# Altium PCB EVB-2.PCBDOC (part 6 of 6)
Units mil, origin at the board's own origin, x right, y up, seen from the top; angles counter-clockwise.
Board outline 2401.57 x 1771.65 mil, 6 copper layers (Top, Mid1-H, Mid2-PWR, GND, Mid3-V, Bottom), stack 59.449 mil thick; 172 components, 166 nets, 823 pads, 550 vias.
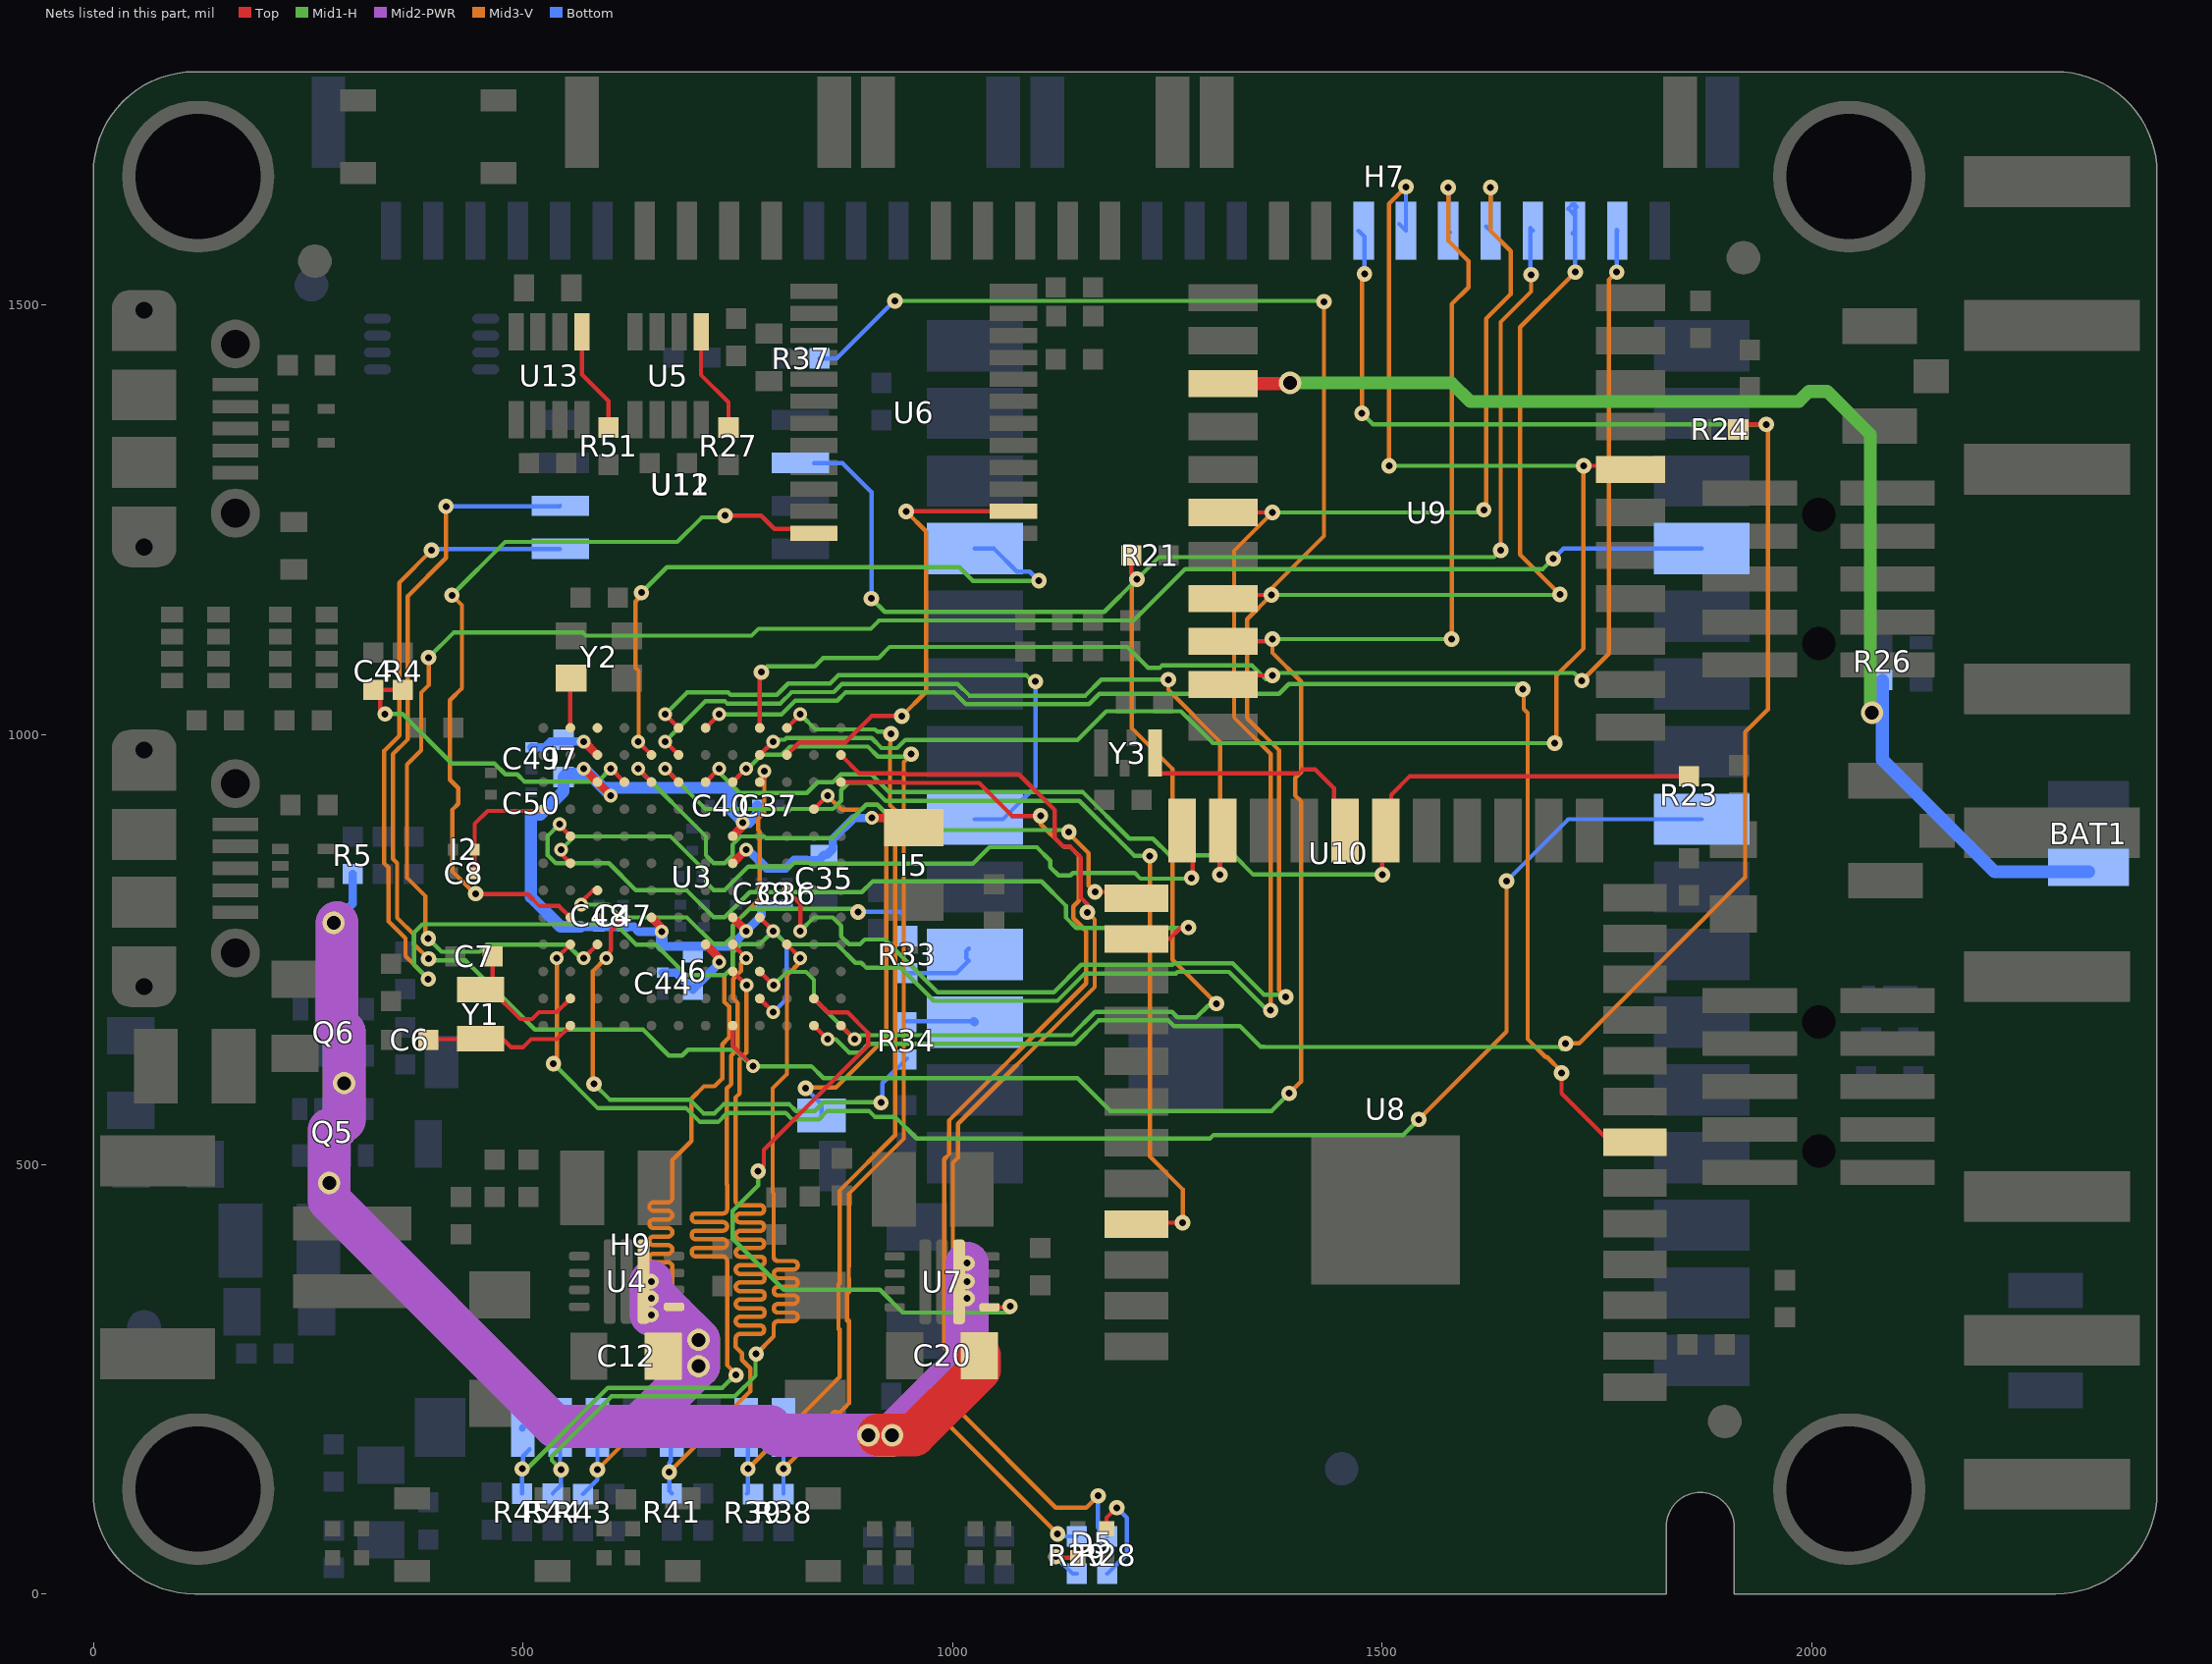
[diagram p8: the nets of this part, all layers, seen from the top]

## Via types
v1: diameter 18, hole 8, Top to Bottom, 385 vias
v2: diameter 16, hole 8, Top to Bottom, 100 vias
v3: diameter 26, hole 16, Top to Bottom, 58 vias
v4: diameter 22, hole 12, Top to Bottom, 3 vias
v5: diameter 20, hole 10, Top to Bottom, 2 vias
v6: diameter 18, hole 8.27, Top to Bottom, 2 vias

## Nets (pads, with @x,y where several pads share a name; then routed paths per layer and width w, separated by ;. In a path a pad name is that pad's centre, name@x,y a point inside that pad or via, vN(x,y) a via of type N, cw(c..) or ccw(c..) an arc to the next point about the centre after c; other vN are vias at no path point) (continued)
SD.CLK: H9.5 R41.2 U3.K8 | length 1190
  Top w5: U3.K8@744.09,724.41 v2(760.05,708.45)
  Mid3-V w5: v1(670.28,141.73) 764.53,235.99 764.53,262.74 754.86,272.4 754.86,280.23 747.59,287.5 747.59,292.5 747.59,297.5 cw(c752.59,297.5) 752.59,302.5 775.74,302.5 ccw(c775.74,307.5) 780.74,307.5 ccw(c775.74,307.5) 775.74,312.5 752.59,312.5 cw(c752.59,317.5) 747.59,317.5 cw(c752.59,317.5) 752.59,322.5 776.37,322.5 ccw(c776.37,327.5) 781.37,327.5 ccw(c776.37,327.5) 776.37,332.5 752.59,332.5 cw(c752.59,337.5) 747.59,337.5 cw(c752.59,337.5) 752.59,342.5 776.37,342.5 ccw(c776.37,347.5) 781.37,347.5 ccw(c776.37,347.5) 776.37,352.5 752.59,352.5 cw(c752.59,357.5) 747.59,357.5 cw(c752.59,357.5) 752.59,362.5 776.37,362.5 ccw(c776.37,367.5) 781.37,367.5 ccw(c776.37,367.5) 776.37,372.5 752.59,372.5 cw(c752.59,377.5) 747.59,377.5 cw(c752.59,377.5) 752.59,382.5 776.37,382.5 ccw(c776.37,387.5) 781.37,387.5 ccw(c776.37,387.5) 776.37,392.5 752.59,392.5 cw(c752.59,397.5) 747.59,397.5 cw(c752.59,397.5) 752.59,402.5 775.74,402.5 ccw(c775.74,407.5) 780.74,407.5 ccw(c775.74,407.5) 775.74,412.5 752.59,412.5 cw(c752.59,417.5) 747.59,417.5 cw(c752.59,417.5) 752.59,422.5 775.74,422.5 ccw(c775.74,427.5) 780.74,427.5 ccw(c775.74,427.5) 775.74,432.5 752.59,432.5 cw(c752.59,437.5) 747.59,437.5 cw(c752.59,437.5) 752.59,442.5 775.74,442.5 ccw(c775.74,447.5) 780.74,447.5 ccw(c775.74,447.5) 775.74,452.5 752.59,452.5 cw(c752.59,457.5) 747.59,457.5 747.59,476 747.59,536.16 747.28,536.47 747.28,577.74 752.21,582.68 752.21,622.41 759.91,630.1 759.91,708.31 v2(760.05,708.45)
  Bottom w5: R41.2@673.23,117.13 670.28,120.08 v1(670.28,141.73) 670.28,152.56 672.24,154.53 672.24,170.49 681.1,179.34 H9.5@681.1,193.9
SD.CMD: H9.3 R43.2 U3.C9 | length 1186.2
  Top w5: U3.C9@775.59,944.88 781.83,951.13 780.89,952.07 v2(780.89,957.67)
  Mid3-V w5: v1(586.61,144.69) 673.84,231.92 673.84,380.91 ccw(c668.84,380.91) 668.84,385.91 652.16,385.91 cw(c652.16,390.91) 647.16,390.91 cw(c652.16,390.91) 652.16,395.91 668.84,395.91 ccw(c668.84,400.91) 673.84,400.91 ccw(c668.84,400.91) 668.84,405.91 652.16,405.91 cw(c652.16,410.91) 647.16,410.91 cw(c652.16,410.91) 652.16,415.91 668.84,415.91 ccw(c668.84,420.91) 673.84,420.91 ccw(c668.84,420.91) 668.84,425.91 652.16,425.91 cw(c652.16,430.91) 647.16,430.91 cw(c652.16,430.91) 652.16,435.91 668.84,435.91 ccw(c668.84,440.91) 673.84,440.91 ccw(c668.84,440.91) 668.84,445.91 652.16,445.91 cw(c652.16,450.91) 647.16,450.91 cw(c652.16,450.91) 652.16,455.91 668.84,455.91 ccw(c668.84,460.91) 673.84,460.91 673.84,504.84 696.1,527.09 696.1,576.29 710.61,590.8 722.95,590.8 732.03,599.88 732.03,639.78 739.91,647.66 739.91,683.58 734.55,688.94 734.55,719.94 743.85,729.23 743.85,777.58 775.34,809.07 775.34,887.15 773.56,888.93 773.56,901.78 780.89,909.11 v2(780.89,957.67)
  Bottom w5: R43.2@569.88,116.14 586.61,132.87 v1(586.61,144.69) H9.3@586.61,193.9
SD.D0: H9.7 R39.2 U3.A10 | length 1183.7
  Top w5: U3.A10@807.09,1007.87 v2(822.83,1023.62)
  Mid1-H w5: v2(822.83,1023.62) 840.28,1006.18 909.76,1006.18 912.46,1003.47 925.66,1003.47 v1(928.15,1000.98)
  Mid3-V w5: v1(761.81,145.67) 798.23,182.09 ccw(c794.69,185.62) 798.23,189.16 cw(c801.76,192.69) 798.23,196.23 cw(c801.76,192.69) 805.3,196.23 808.83,192.7 815.75,185.78 ccw(c819.29,189.31) 822.82,185.78 ccw(c819.29,189.31) 822.82,192.85 818.9,196.77 cw(c821.89,199.77) 818.9,202.76 868.43,252.29 868.43,308.14 867.2,308.14 867.2,361.14 868.43,361.14 868.43,469.11 933.21,533.89 933.21,912.02 927.17,918.06 927.17,978.52 927.17,978.74 v1(928.15,1000.98)
  Bottom w5: R39.2@760.83,116.65 761.81,117.63 v1(761.81,145.67) 761.81,191.93 H9.7@760.83,192.91
  Bottom w8: H9.7@759.84,193.9 H9.7@760.83,192.91
SD.D1: H9.8 R38.2 U3.C8 | length 1212
  Top w5: U3.C8@744.09,944.88 v2(759.84,960.63)
  Mid1-H w5: v2(759.84,960.63) 761.93,960.63 777.93,976.63 801.18,976.63 810.73,986.18 901.47,986.18 913.17,974.48 948.89,974.48 v1(951.82,977.41)
  Mid3-V w5: v1(803.15,145.67) 857.28,199.8 860.82,203.34 860.57,203.58 cw(c864.11,207.12) 860.57,210.65 cw(c864.11,207.12) 867.65,210.65 867.89,210.41 874.51,217.03 879.25,221.77 879.25,318.14 877.2,318.14 877.2,351.14 879.25,351.14 879.25,367.1 879.16,367.18 879.16,380.85 879.25,380.93 879.25,465.79 943.21,529.75 943.21,967.98 951.82,976.59 v1(951.82,977.41)
  Bottom w5: R38.2@803.15,116.65 v1(803.15,145.67) H9.8@803.15,193.9
SD.D2: H9.1 R45.2 U3.J8 | length 1091.2
  Top w5: U3.J8@744.09,755.91 v2(759.84,740.16)
  Mid1-H w5: v1(499.02,145.67) 504.68,145.67 599.02,240 732.12,240 v1@748.03,255.9
  Mid3-V w5: v1@748.03,255.9 737.59,266.34 737.59,387.8 ccw(c732.59,387.8) 732.59,392.8 701.4,392.8 cw(c701.4,397.8) 696.4,397.8 cw(c701.4,397.8) 701.4,402.8 732.59,402.8 ccw(c732.59,407.8) 737.59,407.8 ccw(c732.59,407.8) 732.59,412.8 701.4,412.8 cw(c701.4,417.8) 696.4,417.8 cw(c701.4,417.8) 701.4,422.8 732.59,422.8 ccw(c732.59,427.8) 737.59,427.8 ccw(c732.59,427.8) 732.59,432.8 701.4,432.8 cw(c701.4,437.8) 696.4,437.8 cw(c701.4,437.8) 701.4,442.8 732.59,442.8 ccw(c732.59,447.8) 737.59,447.8 737.59,452.8 737.59,476.03 737.28,476.34 737.28,588.34 742.21,593.28 742.21,626.55 749.91,634.24 749.91,687.73 744.55,693.08 744.55,715.8 753.85,725.09 753.85,734.16 v2(759.84,740.16)
  Bottom w5: R45.2@499.02,116.65 v1(499.02,145.67) ; v1@500,151.58 500,160.43 H9.1@507.87,168.31
  Bottom w8: H9.1@499.02,192.91 H9.1@500,193.9
  other v1: 748.03,254.72
SD.D3: H9.2 R44.2 U3.J10 | length 1097.9
  Top w5: U3.J10@807.09,755.91 v2(822.83,740.16)
  Mid1-H w5: v1(544.29,144.69) 533.46,155.51 533.46,160.31 603.16,230 746.64,230 770.59,253.95 770.59,278.47 v1(771.36,279.24)
  Mid3-V w5: v1(771.36,279.24) 791.79,299.66 791.79,302.5 791.79,307.5 791.79,312.5 cw(c796.79,312.5) 796.79,317.5 814.84,317.5 ccw(c814.84,322.5) 819.84,322.5 ccw(c814.84,322.5) 814.84,327.5 796.79,327.5 cw(c796.79,332.5) 791.79,332.5 cw(c796.79,332.5) 796.79,337.5 814.84,337.5 ccw(c814.84,342.5) 819.84,342.5 ccw(c814.84,342.5) 814.84,347.5 796.79,347.5 cw(c796.79,352.5) 791.79,352.5 cw(c796.79,352.5) 796.79,357.5 814.84,357.5 ccw(c814.84,362.5) 819.84,362.5 ccw(c814.84,362.5) 814.84,367.5 796.79,367.5 cw(c796.79,372.5) 791.79,372.5 cw(c796.79,372.5) 796.79,377.5 814.84,377.5 ccw(c814.84,382.5) 819.84,382.5 ccw(c814.84,382.5) 814.84,387.5 796.79,387.5 cw(c796.79,392.5) 791.79,392.5 791.79,405.51 791.79,466.54 790.63,467.7 790.63,588.51 807.12,605 807.12,652.3 ; 807.13,652.31 807.13,719.88 822.83,735.59 v2(822.83,740.16)
  Bottom w5: R44.2@534.74,117.13 544.29,126.68 v1(544.29,144.69) ; v1@543.31,144.69 H9.2@543.31,193.9
SD.DETECT: H9.S1 U3.D11 | length 522.6
  Top w5: U3.D11@838.58,913.39 v2(854.33,929.13)
  Mid3-V w5: v1(828.78,588.61) 829.53,589.36 864.17,589.36 923.04,648.23 923.04,908.04 912.47,918.61 899.63,918.61 893.72,912.69 870.77,912.69 v2(854.33,929.13)
  Bottom w5: v1(828.78,588.61) 828.78,588.54 847.44,569.88 H9.S1@847.44,557.09
SHDN1: R27.1 U5.5 | length 124.7
  Top w5: U5.5@707.22,1468.97 707.22,1418.76 739.17,1386.81 R27.1@739.17,1357.49
SHDN2: R51.1 U13.5 | length 124.3
  Top w5: U13.5@568.68,1468.97 568.68,1419.18 599.55,1388.31 R51.1@599.55,1357.49
SP330-DUPLEX: U3.B10 U6.14 | length 537.1
  Top w5: U3.B10@807.09,976.38 821.85,991.14 875.27,991.14 905.83,1021.7 v1(940.99,1021.7) ; v1(945.87,1259.84) 946.07,1260.05 U6.14@1070.87,1260.05
  Mid3-V w5: v1(940.99,1021.7) 969.05,1049.76 969.05,1236.66 v1(945.87,1259.84)
SP330-SLEW: U3.H2 U6.12 | length 970.6
  Top w5: v1@440.26,814.64 505.25,814.64 519.26,800.62 541.9,800.62 U3.H2@555.12,787.4 ; v1(735.27,1254.98) 777.2,1254.98 792.7,1239.49 833.55,1239.49 U6.12@838.58,1234.46
  Mid1-H w5: v1(417.32,1162.4) 479.33,1224.41 679.58,1224.41 708.2,1253.03 733.32,1253.03 v1(735.27,1254.98)
  Mid3-V w5: v1(417.32,1162.4) 429.03,1150.69 429.03,1054.03 415.12,1040.12 415.12,947.52 424.61,938.03 424.61,919.51 418.07,912.96 418.07,840.85 440.94,817.98 443.96,814.96 v1(444.88,814.96)
uINS-Ser0.RxD: H7.8 U3.B9 U9.18 | length 2004.1
  Top w5: U3.B9@775.59,976.38 v2(791.34,992.13) ; v1(1734.25,1312.99) 1789.61,1312.99 U9.18@1793.94,1308.66
  Mid1-H w5: v2@792.41,996.18 794.36,994.23 804.64,994.23 806.59,996.18 905.62,996.18 917.31,984.48 935.56,984.48 944.98,993.91 1145.4,993.91 1178.86,1027.38 1265.75,1027.38 1302.97,990.16 1695.67,990.16 1698.23,992.72 1700.8,995.29 v1@1706.4,995.28 ; v1(1507.87,1312.99) v1(1734.25,1312.99) ; v1@1698.82,992.13 v1(1700.79,990.16)
  Mid3-V w5: v2(791.34,992.13) v2@794.05,994.84 ; v1(1507.87,1312.99) 1507.87,1617.93 v1(1527.56,1637.61) ; v1(1700.79,990.16) 1702.76,992.13 1702.76,1068.9 1734.25,1100.39 v1(1734.25,1312.99)
  Bottom w5: H7.8@1519.68,1594.49 H7.8@1527.56,1586.61 v1(1527.56,1637.61)
uINS-Ser0.TxD: H7.7 R24.2 U3.M11 | length 2472.9
  Top w5: U3.M11@838.58,661.42 v2(854.33,645.67) ; R24.2@1914.37,1355.31 1920.28,1361.23 v1(1946.85,1361.23)
  Mid1-H w5: v2(854.33,645.67) 863.91,645.67 879.41,630.17 892.25,630.17 902.35,640.27 1142.7,640.27 1169.92,667.49 1251.07,667.49 1257.57,660.99 1334.2,660.99 1358.47,636.73 1362.46,636.73 1362.61,636.58 1706.67,636.58 v1@1709.15,634.09 ; v1@1472.44,1377.95 v1(1476.38,1374.02) 1489.17,1361.23 v1(1946.85,1361.23)
  Mid3-V w5: v1(1476.38,1374.02) 1476.38,1533.46 v1(1479.33,1536.42) ; v1(1713.48,640.64) 1728.93,640.64 1922.24,833.95 1922.24,1002.95 1948.82,1029.53 v1@1948.82,1361.23
  Bottom w5: H7.7@1472.44,1586.61 1479.33,1579.72 v1(1479.33,1536.42)
uINS-Ser1.CS: H7.12 R37.2 U3.G10 U9.8 | length 3125.7
  Top w5: U3.G10@807.09,818.9 822.83,803.15 v2(822.83,771.65) ; U9.8@1309.68,1158.66 1309.88,1158.46 1314.07,1162.65 v1(1371.06,1162.65)
  Mid1-H w5: v2(822.83,771.65) 838.58,787.4 860.5,787.4 870.33,777.58 870.33,765.23 879.41,756.15 892.25,756.15 897.71,761.62 921.2,761.62 982.53,700.29 1117.86,700.29 1149.72,732.14 1255.72,732.14 1257.57,733.99 1325.86,733.99 1362.36,697.49 v1@1387.8,697.49 ; v1(932.82,1504.92) 1431.1,1504.92 v1(1432.09,1503.94) ; v1(1371.06,1162.65) 1705.96,1162.65 v1(1706.69,1163.39)
  Mid3-V w5: v1(1387.8,694.88) 1380.08,702.6 1380.08,981.69 1342.82,1018.95 1342.82,1134.4 v1(1371.06,1162.65) 1371.06,1170.28 1432.09,1231.3 v1(1432.09,1503.94) ; v1(1706.69,1163.39) 1660.43,1209.65 1660.43,1474.33 v1(1724.56,1538.46)
  Bottom w5: R37.2@845,1437.99 865.16,1437.99 932.09,1504.92 v1(932.82,1504.92) ; H7.12@1721.46,1583.66 H7.12@1724.41,1586.61 1724.41,1604.33 1716.53,1612.21 1722.59,1618.27 1726.37,1614.49 1724.56,1612.68 v1(1724.56,1538.46)
uINS-Ser1.RxD/MOSI: H7.10 U3.H9 U3.L9 U9.6 U11.5 U12.5 | length 3409.4
  Top w5: U3.L9@775.59,692.91 v2(791.33,677.16) ; U3.H9@775.59,787.4 v2(791.34,771.65) ; U9.6@1309.68,1258.66 v1(1372.22,1258.66)
  Mid1-H w5: v1(389.85,715.59) 373.28,732.15 373.28,769.67 382.95,779.33 608.1,779.33 631.78,755.66 654.58,755.66 690.08,720.15 734.77,720.15 743.85,729.23 743.85,746.08 753.92,756.15 775.84,756.15 v2(791.34,771.65) 807.09,755.91 865.51,755.91 886.76,734.66 893.66,734.66 899.71,728.62 940.05,728.62 978.38,690.29 1122.01,690.29 1153.86,722.14 1259.87,722.14 1261.72,723.99 1321.71,723.99 1366.57,679.13 v1(1370.08,679.13) ; v1(1372.22,1258.66) 1614.96,1258.66 v1(1618.11,1261.81)
  Mid3-V w5: v1(389.85,715.59) 389.85,716.04 363.28,742.61 363.28,763.1 343.6,782.79 343.6,845.3 338.58,850.32 338.58,981.4 356.07,998.89 356.07,1062.28 ; v1(393.7,1214.57) 356.03,1176.9 356.03,1062.32 ; v1(1370.08,679.13) 1370.08,977.55 1327.67,1019.96 1327.67,1214.11 v1(1372.22,1258.66) ; v1(1618.11,1261.81) 1621.06,1264.78 1621.06,1484.25 1649.61,1512.8 1649.61,1562.99 1625.99,1586.61 v1(1625.99,1636.81) ; 356.03,1062.32 356.07,1062.28
  Bottom w5: v1(393.7,1214.57) 395.47,1216.34 U11.5@543.31,1216.34 ; v2(791.33,677.16) 807.05,692.88 807.05,755.94 v2(791.34,771.65) ; H7.10@1621.06,1591.54 H7.10@1625.98,1586.61 v1(1625.99,1636.81)
uINS-Ser1.SCLK: H7.9 U3.M8 U9.9 U11.6 U12.6 | length 3271.7
  Top w5: U3.M8@744.09,661.42 744.09,637.79 v2(767.71,614.17) ; U9.9@1309.68,1108.66 1369.6,1108.66 v1(1372.22,1111.27)
  Mid1-H w5: v1(390.02,739.21) 391.77,737.46 433.13,737.46 513.82,656.78 639.81,656.78 669.91,626.68 685.11,626.68 691.97,633.54 746.53,633.54 765.9,614.17 v2(767.71,614.17) 835.62,614.17 849.63,600.17 1145.43,600.17 1183.37,562.22 1371.28,562.22 v1(1391.73,582.68) ; v1(1372.22,1111.27) v1(1580.79,1111.27)
  Mid3-V w5: v1(390.02,739.21) v1(390.02,739.21) 373.28,756 373.28,767.25 353.6,786.93 353.6,850.63 348.58,855.64 348.58,977.26 366.07,994.74 366.07,1066.42 366.03,1066.46 366.03,1161.31 410.43,1205.71 v1(410.43,1265.75) ; v1(1372.22,1111.27) 1372.22,1095.3 1405.51,1062.01 1405.51,956.41 1398.85,949.75 1398.85,929.19 1405.51,922.53 1405.51,596.46 v1(1391.73,582.68) ; v1(1576.77,1636.81) 1576.77,1574.8 1600.39,1551.18 1600.39,1520.67 1580.79,1501.06 v1(1580.79,1111.27)
  Bottom w5: v1@411.02,1266.34 v1(410.43,1265.75) 542.72,1265.75 U11.6@543.31,1266.34 ; v1(1576.77,1636.81) H7.9@1576.77,1586.61 H7.9@1578.74,1584.65
uINS-Ser1.TxD/MISO: H7.11 R21.2 U3.K9 U3.M12 U11.2 U12.2 | length 2566.2
  Top w5: U3.K9@775.59,724.41 v2(791.55,708.45) ; U3.M12@870.08,661.42 v2(885.83,645.67) ; R21.2@1208.03,1208.66 1208.03,1187.64 v1(1214.57,1181.1)
  Mid1-H w5: v2(791.55,708.45) 807.05,723.95 829.46,723.95 838.54,714.87 838.54,692.92 851.34,680.12 ; 851.38,680.12 v2(885.83,645.67) 888.8,645.67 893.42,650.29 1138.57,650.29 1165.78,677.49 1255.22,677.49 1261.72,670.99 1283.67,670.99 1297.64,684.96 1307.08,684.96 v1(1307.08,687.01) ; v1@905.56,1158.52 v1(905.56,1158.46) 921.07,1142.95 1176.41,1142.95 v1(1214.57,1181.1) 1240.16,1206.69 1629.92,1206.69 v1(1637.8,1214.57)
  Mid3-V w5: v1@1211.54,1178.07 1208.66,1175.2 1208.66,1007.43 1256.07,960.02 1256.07,738.02 v1(1307.08,687.01) ; v1(1637.8,1214.57) 1637.8,1480.31 1673.23,1515.75 v1(1673.23,1535.43)
  Bottom w5: U12.2@838.58,1316.14 871.84,1316.14 905.56,1282.43 v1@905.56,1158.52 ; v1@1672.24,1535.43 1672.24,1589.57 H7.11@1675.2,1586.61
uINS-SPI-EN: H7.13 U3.A9 U9.10 | length 1675.8
  Top w5: U3.A9@775.59,1007.87 775.59,1070.87 v1(777.55,1072.83) ; U9.10@1309.68,1058.66 1320.02,1069 v1(1372.27,1069)
  Mid1-H w5: v1(777.55,1072.83) 784.32,1079.6 839.62,1079.6 849.14,1089.12 913.65,1089.12 926.7,1102.17 1203.35,1102.17 1227.48,1078.04 1241.15,1078.04 1243.63,1080.53 1348.6,1080.53 1364.17,1064.96 1371.13,1071.92 1723.35,1071.92 v1(1732.28,1062.99)
  Mid3-V w5: v1(1732.28,1062.99) 1763.78,1094.49 1763.78,1529.45 v1(1772.79,1538.46)
  Bottom w5: 1364.17,1064.96 1368.21,1069 v1(1372.27,1069) ; v1(1772.79,1538.46) 1772.79,1587.44 H7.13@1773.62,1586.61
VBAT: BAT1.+ R26.1 U9.3 | length 1504.1
  Top w15: U9.3@1309.68,1408.66 1391.93,1408.66 v3(1392.72,1409.45)
  Mid1-H w15: v3(1392.72,1409.45) 1580.71,1409.45 1602.21,1387.95 1985,1387.95 1996.51,1399.45 2017.87,1399.45 2068.15,1349.17 2068.15,1027.32 v3(2069.88,1025.59)
  Bottom w15: R26.1@2082.05,1063.48 2082.05,971.1 2212.83,840.31 BAT1.+@2322.06,840.31
VBG: C4.1 R4.1 U3.C4 | length 381.2
  Top w5: v1(339.57,1024.1) 333.66,1030.01 333.66,1052.09 360.16,1052.09 R4.1@360.24,1052.17 ; v2(602.36,960.63) U3.C4@618.11,944.88
  Mid1-H w5: v1(339.57,1024.1) 359.75,1024.1 417.32,966.54 466.82,966.54 479.57,953.78 493.33,953.78 501.98,945.13 586.86,945.13 v2(602.36,960.63)
VDDOUT: C36.1 C37.1 C38.1 C40.1 C47.1 C48.1 C50.1 I6.2 I7.2 U3.C3 U3.E8 U3.H5 U3.H8 | length 919.5
  Top w10: v2(570.87,960.63) U3.C3@586.61,944.88 v2(602.36,929.13) ; U3.H5@649.36,787.65 v2@663.88,773.13 ; U3.H8@744.09,787.4 v2(759.84,771.65) ; U3.E8@744.09,881.89 v2@757.87,895.67
  Bottom w10: 566.93,776.57 C48.1@588.58,776.57 C47.1@616.14,776.57 628.94,776.57 634.8,770.71 v2(661.45,770.71) ; 661.43,753.65 741.84,753.65 v2(759.84,771.65) 777.56,789.37 C38.1@777.56,802.16 C36.1@807.09,802.16
  Bottom w12: C40.1@743.11,916.42 743.11,910.43 v2(755.9,897.64) 762.79,897.64 772.63,907.48 C37.1@772.63,917.32 ; C40.1@743.11,917.32 743.11,932.08
  Bottom w14: 566.93,776.57 543.71,776.57 509.19,811.09 509.19,906.83 520.01,906.83 547.25,934.06 I7.2@547.25,950.79 551.18,954.72 v2@570.87,954.72 ; v2(570.87,960.63) 593.31,938.19 ; v2(602.36,929.13) 593.31,938.19 ; 661.43,753.65 v2@661.43,770.69 ; 743.11,932.08 737,938.19 593.31,938.19
VDDPLL: C44.1 I6.1 U3.J7 | length 110.5
  Top w10: U3.J7@712.6,755.91 v2@728.35,740.16
  Bottom w10: C44.1@662.64,723.17 678.09,723.17 I6.1@697.84,703.42 727.2,732.78 727.2,734.51 v2(728.35,735.65)
VDDPLLUSB: C35.1 I5.1 U3.F8 | length 262.7
  Top w10: U3.F8@744.09,850.39 v2(759.84,866.14) ; v2(906.05,903.11) 943.35,903.11 I5.1@954.72,891.73
  Bottom w10: v2(759.84,866.14) 761.94,866.14 783.88,844.2 805.46,844.2 815.38,854.13 830.29,854.13 830.88,853.53 843.69,853.53 C35.1@850.39,860.24 853.86,860.24 860.67,867.05 860.67,878.73 885.05,903.11 v2(906.05,903.11)
VDDUTMIC: C49.1 I7.1 U3.B3 | length 86.1
  Top w10: v2(570.87,992.13) U3.B3@586.61,976.38
  Bottom w10: C49.1@509.84,985.24 525.6,985.24 532.48,992.13 v2(570.87,992.13)
VIN: C12.1 C20.1 Q5.S2 Q6.S2 R5.2 U4.1 U4.8 U7.1 | length 1976.3
  Top w50: v3@913.89,185.04 955.33,185.04 1031.12,260.83 C20.1@1031.12,277.33
  Mid2-PWR w8: v3@270.67,790.02 v3(279.69,781)
  Mid2-PWR w50: 274.57,540.34 v3(274.57,478.31) 274.57,458.07 537.64,195 ; 283.46,543.27 291.75,551.56 v3(291.75,594.49) 291.75,654 283.63,662.13 v3@283.63,781 ; 541.57,195 634.34,195 ; v1(649.23,363.68) v1(649.23,344) ; v1(1016.74,385) v1(1016.74,363.68) v1(1016.74,344) 1016.74,271.81 v3(929.63,184.71) v3(902.07,184.71) 797.69,184.71 787.4,195 634.34,195 ; 634.34,195 v3(704.34,265) v3(704.34,295.77) 675.31,324.8 ; v1(649.23,344) 656.12,344 675.31,324.8 ; v1(649.23,344) v1(649.23,324.8) 675.31,324.8
  Bottom w10: v3(279.69,781) 301.99,803.29 R5.2@301.99,837.93
  Bottom w18: v3@279.69,780 279.69,740.82 292.32,728.19 Q6.S2@292.32,680.55 ; Q5.S2@291.34,564.41 291.34,594.07 v3(291.75,594.49)
VREFP: C8.1 I2.1 U3.D1 | length 144.6
  Top w5: C8.1@443.9,838.58 I2.1@443.9,866.27 443.9,896.37 458.95,911.42 521.65,911.42 U3.D1@523.62,913.39
W_RTC: U8.20 Y3.3 | length 290.6
  Top w5: Y3.3@1234.25,954.88 1402.48,954.88 1407.02,959.41 1422.19,959.41 1443.9,937.7 1443.9,917.32 1456.54,904.69 U8.20@1456.54,888.35 ; Y3.3@1235.69,963.13 Y3.3@1235.69,978.63
WiFi-EN: R23.2 U3.C7 U8.19 | length 1324.1
  Top w5: U3.C7@712.6,944.88 v2(728.35,960.63) ; v1(1500,837.16) U8.19@1500,892.28 ; U8.19@1503.94,888.35 U8.19@1500,892.28 ; R23.2@1857.05,951.77 1532.19,951.77 1510.35,929.93 1510.35,902.63 U8.19@1500,892.28
  Mid1-H w5: v2(728.35,960.63) 728.35,956.06 752.24,932.17 830.44,932.17 842.9,944.63 860.75,944.63 870.05,953.94 905.43,953.94 926.23,933.14 1151.58,933.14 1205.58,879.14 1233.12,879.14 1252.45,859.81 1327.2,859.81 1349.85,837.16 v1(1500,837.16)
WiFi-IRQN: U3.C6 U8.33 | length 1161.6
  Top w5: v2(665.35,960.63) U3.C6@681.1,944.88 ; U8.33@1213.94,430.37 1212.22,432.09 v1(1267.72,432.09)
  Mid1-H w5: v2(665.35,960.63) 712.35,913.63 860.75,913.63 870.33,923.21 870.33,935.53 878.74,943.94 901.29,943.94 922.09,923.14 1147.44,923.14 1211.5,859.07 v1(1229.57,859.07)
  Mid3-V w5: v1(1229.57,859.07) 1229.57,509.1 1267.72,470.95 v1(1267.72,432.09)
WiFi-RST: U3.A7 U8.7 | length 1591
  Top w5: U3.A7@712.6,1007.87 v2(728.35,1023.62) ; v1(1708.66,606.3) 1708.66,582.68 1765.53,525.81 U8.7@1793.94,525.81
  Mid1-H w5: v2(728.35,1023.62) 800.91,1023.62 816.89,1039.6 865.74,1039.6 875.26,1049.12 1001.9,1049.12 1015.51,1035.51 1158.71,1035.51 1170.73,1047.53 1379.84,1047.53 1391.37,1059.06 1657.47,1059.06 v1(1663.38,1053.15)
  Mid3-V w5: v1@1663.38,1046.93 v1(1663.38,1053.15) 1664.6,1051.92 1664.6,1029.97 1669.29,1025.28 1669.29,645.66 1690.19,624.77 1691.87,624.77 1708.66,607.99 v1(1708.66,606.3)
WiFi-SPI.CS: U3.C5 U8.25 | length 753.6
  Top w5: v2(633.86,960.63) U3.C5@649.61,944.88 ; v1(1165.78,817.06) 1192.15,817.06 U8.25@1201.19,808.02
  Mid1-H w5: v2(633.86,960.63) 712.85,881.64 712.85,859.72 721.93,850.64 734.77,850.64 743.85,859.72 743.85,872.07 753.42,881.64 780.85,881.64 782.64,879.85 860.31,879.85 899.06,918.61 912.47,918.61 942.07,889.01 1133.03,889.01 v1(1135.33,886.71)
  Mid3-V w5: v1(1135.33,886.71) 1135.33,885.07 1158.42,861.98 1158.42,824.41 v1(1165.78,817.06)
WiFi-SPI.MISO: U3.F2 U8.24 | length 900.4
  Top w5: v2@539.37,866.14 U3.F2@555.12,850.39 ; U8.24@1266.93,888.35 1279.53,875.75 1279.53,834.65 v1(1278.19,833.31)
  Mid1-H w5: v2(544.32,866.18) 559.78,881.64 671.77,881.64 712.85,840.57 712.85,828.23 721.93,819.15 734.77,819.15 762.32,846.7 811.49,846.7 815.82,851.03 833.41,851.03 834.62,849.81 1023.65,849.81 1042.84,869.01 1098.07,869.01 1113.79,853.29 1113.79,845.79 1123.46,836.13 1137.12,836.13 1140.07,839.07 1212.09,839.07 1218.59,832.57 1277.45,832.57 v1(1278.19,833.31)
WiFi-SPI.MOSI: U3.E2 U8.26 | length 954
  Top w5: v2@539.37,897.64 U3.E2@555.12,881.89 ; U8.26@1213.94,762.18 1252.33,762.18 1265.75,775.59 v1(1274.47,775.59)
  Mid1-H w5: v2(542.6,896.11) 528.82,882.33 528.82,859.76 538.19,850.39 600.12,850.39 631.62,818.9 690.68,818.9 721.93,787.65 734.77,787.65 763.93,816.81 894.41,816.81 907.09,829.49 1103.34,829.49 1131.76,801.08 1131.76,787.4 1144.02,775.14 1274.03,775.14 v1(1274.47,775.59)
WiFi-SPI.SCLK: U3.B6 U8.23 | length 962.3
  Top w5: v2(665.35,992.13) U3.B6@681.1,976.38 ; v1(1311.19,837.16) 1311.19,869.12 1303.14,877.16 U8.23@1314.33,888.35
  Mid1-H w5: v2(665.35,992.13) 712.35,1039.12 734.77,1039.12 737.56,1036.33 799.48,1036.33 812.75,1049.6 861.6,1049.6 871.12,1059.12 1006.04,1059.12 1019.65,1045.51 1154.57,1045.51 1173.09,1064.03 v1(1251.05,1064.03)
  Mid3-V w5: v1(1251.05,1064.03) 1251.05,1052.1 1311.19,991.96 v1(1311.19,837.16)
WINC-LED.Rx: R28.2 U3.B12 | length 1335.6
  Top w5: U3.B12@870.08,976.38 891.57,954.88 945.12,954.88 946.03,953.97 1077.23,953.97 1118.86,912.34 1118.86,898.68 1118.83,879.88 1128.98,869.72 1136.53,869.72 1149.28,856.97 1149.28,810.22 1156.94,802.56 v1(1156.94,793.37)
  Mid3-V w5: v1(1156.94,793.37) 1165.33,784.98 1165.33,706.38 1144.74,685.79 1006.17,547.23 1006.17,507.86 1000.24,501.93 1000.24,291.29 1004.72,286.81 1004.72,215.75 1120.08,100.39 1155.51,100.39 v1(1169.29,114.17)
  Bottom w5: v1(1169.29,114.17) 1169.29,77.76 R28.2@1180.12,66.93
WINC-LED.Tx: R29.2 U3.C12 | length 1262.6
  Top w5: U3.C12@870.08,944.88 940.98,944.88 941.89,943.97 1030.7,943.97 1069.16,905.51 v1(1102.36,905.51)
  Mid3-V w5: v1(1102.36,905.51) 1102.36,896.34 1128.98,869.72 1136.53,869.72 1146.79,859.46 1146.79,806.56 1140.44,800.2 1140.44,786.53 1155.33,771.64 1155.33,710.52 1140.59,695.79 996.17,551.37 996.17,512.01 990.24,506.07 990.24,287.15 994.72,282.67 994.72,197.33 v1(1122.17,69.89)
  Bottom w5: v1(1122.17,69.89) 1125.13,66.93 R29.2@1144.68,66.93
WINC.Grn: D5.4 R28.1 | length 120.5
  Top w5: D5.4@1179.13,75.79 1179.13,88.58 v1(1190.94,100.39)
  Bottom w5: R28.1@1180.12,23.62 1202.76,46.26 1202.76,88.58 v1(1190.94,100.39)
WINC.Red: D5.2 R29.1 | length 58.8
  Top w5: v1(1120.08,43.31) 1121.06,42.32 D5.2@1145.67,42.32
  Bottom w5: v1(1120.08,43.31) 1139.76,23.62 R29.1@1144.68,23.62
XBee-DTR: U3.B5 U10.10 | length 771.6
  Top w5: v2(633.86,992.13) U3.B5@649.61,976.38
  Mid1-H w5: v1(637.8,1165.35) 667.41,1194.96 1007.62,1194.96 1023.45,1179.13 v1(1100.39,1179.13)
  Mid3-V w5: v2(633.86,992.13) 634.62,992.89 634.62,1074.29 630.98,1077.94 630.98,1155.02 637.8,1161.84 v1(637.8,1165.35)
  Bottom w5: U10.10@1025.82,1216.54 1048.23,1216.54 1074.8,1189.96 1089.57,1189.96 v1(1100.39,1179.13)
XBee-RST: U3.A6 U10.6 | length 686.3
  Top w5: v2(665.35,1023.62) U3.A6@681.1,1007.87
  Mid1-H w5: v2(665.35,1023.62) 690.85,1049.12 738.91,1049.12 741.7,1046.33 795.34,1046.33 808.61,1059.6 857.46,1059.6 866.98,1069.12 1085.82,1069.12 1092.94,1062.01 v1(1096.46,1062.01)
  Bottom w5: U10.6@1025.82,901.57 1058.49,901.57 1096.46,939.55 v1(1096.46,1062.01)
XBee-Ser.CTS: U3.J3 U10.25 | length 2104.2
  Top w5: v2(570.87,740.16) U3.J3@586.61,755.91
  Mid1-H w5: v1(389.78,762.83) 405.16,747.46 449.81,747.46 458.01,755.66 551.33,755.66 566.83,740.16 v2(570.87,740.16) ; v1(390.25,1089.74) 419.36,1118.86 569.63,1118.86 573.26,1115.23 766.11,1115.23 774.15,1123.28 904.83,1123.28 914.5,1132.95 1210.7,1132.95 1270.67,1192.91 1687.01,1192.91 v1(1698.82,1204.72)
  Mid3-V w5: v1(389.78,762.83) 386.6,766.02 386.6,811.99 365.07,833.52 365.07,965.46 381.64,982.03 381.64,1049.07 390.25,1057.67 v1(390.25,1089.74)
  Bottom w5: v1(1698.82,1204.72) 1710.63,1216.54 U10.25@1871.82,1216.54
XBee-Ser.RTS: U3.J2 U10.29 | length 1793
  Top w5: v2(539.37,740.16) U3.J2@555.12,755.91
  Mid1-H w5: v1(535.46,617.16) 587.32,565.3 689.98,565.3 705.97,549.3 727.1,549.3 737.6,559.81 805.89,559.81 813.59,552.11 843.9,552.11 854.01,562.22 902.7,562.22 909.57,555.35 932.84,555.35 958.19,530 1299.5,530 1303.7,534.2 1524.36,534.2 v1(1542.32,552.17)
  Mid3-V w5: v1(535.46,617.16) 539.37,621.07 v2(539.37,740.16) ; v1(1542.32,552.17) 1644.68,654.53 v1(1644.68,829.72)
  Bottom w5: v1(1644.68,829.72) 1716.54,901.57 U10.29@1871.82,901.57
Xbee-Ser.RxD: R33.1 U3.G3 | length 472.8
  Top w5: v2(567.94,802.2) 567.94,805.26 581.58,818.9 U3.G3@586.61,818.9
  Mid1-H w5: v2(567.94,802.2) 599.37,802.2 614.17,787.4 690.68,787.4 721.93,756.15 734.77,756.15 743.85,765.23 743.85,777.58 763.67,797.4 886.5,797.4 v1(890.12,793.78)
  Bottom w5: v1(890.12,793.78) 938.51,793.78 943.21,789.07 R33.1@943.21,765.75
Xbee-Ser.TxD: R34.1 U3.H4 | length 633.9
  Top w5: v2(596.77,740.16) 596.77,743.13 602.36,748.72 602.36,771.65 U3.H4@618.11,787.4
  Mid1-H w5: v1(582.68,593.5) 600.88,575.3 694.12,575.3 710.11,559.3 722.95,559.3 733.46,569.81 810.03,569.81 817.73,562.11 839.76,562.11 849.87,572.22 916.34,572.22 v1(916.71,571.85)
  Mid3-V w5: v1(582.68,593.5) 581.27,594.91 581.27,724.66 v2(596.77,740.16)
  Bottom w5: v1(916.71,571.85) 918.31,573.45 918.31,594.61 R34.1@947.05,623.35
XBee-Supply-En: U3.L11 U7.8 | length 781.6
  Top w5: v1(773.66,492.15) 780.28,498.77 780.28,516.77 901.57,638.07 901.57,653.12 877.95,676.74 854.75,676.74 U3.L11@838.58,692.91 ; U7.8@1042.93,333.66 1073.03,333.66 v1@1072.05,332.68
  Mid1-H w5: v1(773.66,492.15) 773.66,475.4 744.09,445.83 744.09,413.39 803.38,354.1 915.46,354.1 942.07,327.5 1066.87,327.5 v1@1072.05,332.68
  other v1: 1066.93,334.64
XBeeRxD: R33.2 U10.4 | length 98.1
  Bottom w5: R33.2@943.21,722.44 1004.17,722.44 1018.75,737.02 1015.82,739.95 1015.82,748.24 U10.4@1018.75,751.17
XBeeTxD: R34.2 U10.3 | length 79.3
  Bottom w5: R34.2@947.05,666.65 U10.3@1024.52,666.65
  Bottom w10: U10.3@1024.52,666.65 U10.3@1025.82,665.35
Xin: U3.A2 Y2.3 | length 58.5
  Top w5: U3.A2@555.12,1007.87 555.12,1064.96 Y2.3@556.1,1065.94
Xin32: C7.1 U3.L2 Y1.2 | length 182.2
  Top w5: C7.1@464.57,751.48 464.57,717.03 Y1.2@450.79,703.25 463.02,703.25 497.08,669.2 510.75,669.2 518.72,677.17 539.37,677.17 U3.L2@555.12,692.91
Xout: U3.A3
Xout32: C6.1 U3.M2 Y1.1 | length 179.5
  Top w5: C6.1@391.73,641.73 395.67,645.67 476.72,645.67 486.3,636.09 499.97,636.09 509.55,645.67 539.37,645.67 U3.M2@555.12,661.42
pads on no net: D3.3 D4.3 D5.3 H5.7 H5.8 H5.11 H5.12 H6.7 H6.8 H6.11 H6.12 U1_I.5 U1_M.5 U3.B11 U3.D3 U3.D7 U3.D8 U3.D9 U3.D10 U3.E9 U3.E11 U3.G9 U3.H10 U3.H11 U3.J5 U3.K3 U3.K6 U3.L1 U3.M6 U4. U5.8 U6.8 U6.10 U7. U8.3 U8.4 U8.5 U8.6 U8.14 U8.15 U8.16 U8.17 U8.22 U8.27 U8.29 U8.30 U8.31 U8.32 U8.34 U8.35 U10.5 U10.7 U10.8 U10.9 U10.12 U10.23 U10.24 U10.26 U10.27 U10.28 U10.30 U10.31 U10.32 U10.33 U10.34 U10.36 U10.37 U13.8

## Polygon pours and split planes (outlines as drawn)
GND on Top "REG" (solid, pour order 264): 251.83,1625.98 251.83,1765.83 1917.32,1765.83 1917.32,1625.98
GND on Top "REG" (solid, pour order 274): 2396.47,366.14 2396.47,224.41 2396.47,99.41 1988.19,99.41 1988.19,1673.23 2396.47,1673.23 2396.47,1558.09 2396.47,1395.67 2396.47,975.39 2396.47,802.2
INS.SW on Top "REG" (solid, pour order 216): 613.79,409.36 613.79,520.18 683.68,520.18 683.68,425.69 678.76,420.77 627.57,420.77 627.57,409.36
GND on Top "REG" (solid, pour order 270): 5,236.22 5,546.26 442.81,546.26 442.81,236.22
NetQ1_D1 on Top "REG" (solid, pour order 248): 163.7,1090.55 176.5,1103.35 236.04,1103.35 236.04,1123.03 176.99,1123.03 163.7,1136.32 163.7,1147.64 129.74,1147.64 129.74,1053.15 163.7,1053.15
GND on Top "REG" (solid, pour order 220): 607.89,415.95 534.07,415.95 526.13,408.01 526.13,385 585.25,385 585.25,328.25 578.36,321.36 531.12,321.36 500.6,290.85 434.66,290.85 434.66,191.44 803.15,191.44 803.15,290.85 607.89,290.85
GND on Top "REG" (solid, pour order 218): 952.38,415.95 902.07,415.95 893.25,407.12 893.25,385 952.38,385 952.38,327.76 945.49,320.87 898.24,320.87 867.73,290.35 801.79,290.35 801.79,190.94 896.65,190.95 928.75,190.94 984.86,247.05 984.86,303.15 975.01,312.99 975.01,415.95
VIN on Top "REG" (solid, pour order 226): 1000.6,432.09 1000.6,313.6 990.76,303.75 990.76,246.8 1116.14,246.8 1116.14,326.77 1023.24,326.77 1023.24,432.09
BEE.3V3 on Top "REG" (solid, pour order 228): 801.79,295.77 801.79,377.46 780.13,399.11 780.13,444.39 853.95,444.39 853.95,481.79 894.31,481.79 894.31,520.18 975.01,520.18 975.01,420.77 900.12,420.77 888.4,409.04 888.4,368.46 898.1,358.76 905.62,358.76 922.85,358.76 922.85,348.92 922.36,348.43 899.23,348.43 899.23,343.26 890.12,334.15 884.95,334.15 884.95,315.94 878.56,309.55 864.78,295.77
+3.3V on Top "REG" (solid, pour order 224): 434.66,295.77 434.66,377.46 413.01,399.11 413.01,444.39 486.83,444.39 486.83,481.79 527.18,481.79 527.18,520.18 607.89,520.18 607.89,420.77 533,420.77 521.27,409.04 521.27,368.46 530.98,358.76 538.5,358.76 555.72,358.76 555.72,348.92 555.23,348.43 532.1,348.43 532.1,343.26 522.99,334.15 517.83,334.15 517.83,315.94 511.43,309.55 497.65,295.77
NetQ2_D1 on Top "REG" (solid, pour order 246): 284.51,1148.62 284.51,1054.13 250.55,1054.13 250.55,1148.62
BEE.SW on Top "REG" (solid, pour order 222): 980.92,408.87 980.92,519.68 1050.8,519.68 1050.8,425.19 1045.88,420.28 994.7,420.28 994.7,408.87
VIN on Top "REG" (solid, pour order 210): 632.65,412.65 632.65,313.24 622.8,303.4 622.8,246.9 722.05,246.9 722.05,343.26 655.28,343.26 655.28,412.65
GND on Bottom "REG" (solid, pour order 266): 2043.31,1625.25 2043.31,1766.81 122.05,1766.81 122.05,1625.25
GND on Bottom "RF_BOT" (solid, pour order 278): 2386.81,893.81 1988.19,893.81 1988.19,99.41 2386.81,99.41
GND on Bottom "RF_BOT_NO_THERM" (solid, pour order 262): 2386.81,990.16 1988.19,990.16 1988.19,873.13 2386.81,873.13
GND on Bottom "RF_BOT" (solid, pour order 280): 2386.81,1673.23 1988.19,1673.23 1988.19,961.34 2386.81,961.34
H1_IN on Bottom "REG" (solid, pour order 232): 295.28,266.69 295.28,288.23 404.53,396.5 404.53,472.44 201.28,472.44 201.28,266.69
GND on Bottom "REG" (solid, pour order 272): 1203.25,354.33 1594.49,354.33 1594.49,672.28 1203.25,672.28
GND on Bottom "REG" (solid, pour order 268): 106.3,266.69 196.36,266.69 196.36,359.25 106.3,359.25
GND on Bottom "REG" (solid, pour order 276): 23.62,460.63 128.48,460.63 128.48,570.87 23.62,570.87
NetQ5_D1 on Bottom "REG" (solid, pour order 242): 230.81,495.36 325.3,495.36 325.3,529.32 230.81,529.32
H1.RAW on Bottom "REG" (solid, pour order 236): 196.36,465.1 196.36,527.09 109.75,527.09 109.75,463.63 103.84,457.72 103.84,364.71 196.36,364.71
GND on Mid1-H "INS.3V3" (solid, pour order 260): 1507.87,986.48 1381.12,986.48 1329,1038.93 1141.73,1038.93 1141.73,843.56 1507.87,843.56
+3.3V on Mid2-PWR "Inner-INS.3V3" (solid, pour order 258): 1929.13,18.7 1929.13,76.76 ccw(c1870.07,76.76) 1870.07,135.82 ccw(c1870.07,76.77) 1811.02,76.77 1811.02,18.7 122.05,18.7 cw(c122.54,121.55) 19.68,122.04 19.68,1647.64 cw(c123.03,1648.62) 122.05,1751.97 2283.46,1751.97 cw(c2283.46,1653.54) 2381.89,1653.54 2381.89,132.78 cw(c2274.99,125.6) 2282.15,18.7
GND on GND (split plane): 2291.95,1761.3 2300.38,1760.31 2308.7,1758.65 2316.87,1756.35 2324.83,1753.41 2332.54,1749.86 2339.95,1745.71 2347,1740.99 2353.67,1735.74 2359.9,1729.98 2365.66,1723.75 2370.92,1717.08 2375.63,1710.03 2379.78,1702.62 2383.33,1694.91 2386.27,1686.95 2388.57,1678.78 2390.23,1670.46 2391.22,1662.03 2391.54,1653.95 2391.49,1653.54 2391.49,118.11 2391.54,117.7 2391.22,109.62 2390.23,101.19 2388.57,92.87 2386.27,84.7 2383.33,76.74 2379.78,69.03 2375.63,61.63 2370.92,54.57 2365.66,47.91 2359.9,41.67 2353.67,35.91 2347.01,30.66 2339.95,25.94 2332.54,21.8 2324.84,18.24 2316.88,15.31 2308.71,13 2300.38,11.35 2291.96,10.35 2283.87,10.03 2283.47,10.09 2283.46,10.09 2041.62,10.09 2041.62,224.41 1706.69,224.41 1706.69,271.68 1086,271.68 894.31,79.99 894.89,10.09 118.11,10.09 117.7,10.03 109.63,10.35 101.2,11.35 92.87,13 84.71,15.31 76.74,18.24 69.03,21.8 61.63,25.94 54.57,30.66 47.91,35.91 41.68,41.68 35.91,47.91 30.66,54.57 25.94,61.63 21.8,69.03 18.24,76.74 15.31,84.71 13,92.87 11.35,101.2 10.35,109.63 10.03,117.7 10.09,118.11 10.09,1653.54 10.03,1653.95 10.35,1662.02 11.35,1670.45 13,1678.78 15.31,1686.95 18.24,1694.91 21.8,1702.62 25.95,1710.02 30.66,1717.08 35.92,1723.74 41.68,1729.98 47.91,1735.74 54.57,1740.99 61.63,1745.71 69.04,1749.86 76.74,1753.41 84.71,1756.35 92.88,1758.65 101.2,1760.31 109.63,1761.3 117.7,1761.62 118.11,1761.57 2283.46,1761.57 2283.47,1761.57 2283.87,1761.62

## Other copper
Mid2-PWR:
  pour cut-out: 894.31,79.99 1086,271.68 2041.62,271.68 2041.62,0 894.97,0
GND (plane layer: these items are gaps in the copper):
  pour cut-out: 2041.62,224.41 1706.69,224.41 1706.69,271.68 1086,271.68 894.31,79.99 894.97,0 2041.62,0

## Silkscreen, mask and mechanical layers (free items; w line width, h text height)
Silkscreen Top:
  text "RESET" at 295.28,1574.8 h50
  text "GPS1" at 2195.87,1543.31 h60
  text "uINS USB" at 200.05,1446.52 h55
  text "ERASE" at 1990.16,1359.76 h40 r90
  text "Inertial Sense" at 302.9,1181.49 h80
  text "I2C" at 1069.69,1150.13 h40
  text "EVB" at 724.02,1072.28 h80
  text "2.1" at 882.41,1072.35 h80
  text "uINS JTAG" at 1854.33,980.32 h50
  text "r'.PcbRevision'" at 918.63,954.88 h70
  text "GPS2" at 2196.94,952.57 h60
  text "EVB USB" at 199.79,934.88 h55
  text "ERASE" at 1110.68,729.48 h40 r90
  text "+" at 295.28,457.68 h30
  text "EVB JTAG" at 1854.33,389.76 h50
  text "Xbee" at 2195.87,362.2 h60
  text "-" at 295.28,303.4 h30
  text "CONFIG" at 279.76,133.63 h60
  text "LOG" at 570.44,131.89 h60
  text "uINS" at 965.55,92.52 h55 r90
  text "Xbee" at 1083.66,92.52 h55 r90
  text "WiFi" at 1202.76,92.52 h55 r90
Silkscreen Bottom:
  lines w3.94: 724.41,775.59 736.22,763.78 767.72,763.78
  text "GPS1" at 2366.92,1543.31 h60
  text "/" at 775.59,1148.69 h20
  text "GPS2" at 2370.08,1094.49 h60
  text "'.PcbPartNumber'" at 224.41,1013.78 h70 r270
  text "Micro SD Card" at 862.2,627.95 h60
  text "Xbee" at 2365.04,377.95 h60
  text "Inertial" at 1814.35,87.73 h80
  text "2.1" at 1365.24,12.99 h80
  text "EVB" at 1523.62,12.93 h80
  text "Sense" at 1814.35,12.93 h80
Dimensions:
  drawing of 403 lines, arcs and shapes, not listed
  text "Layer" at 2647.01,1513.84 h50
  text "Name" at 2991.94,1513.84 h50
  text "Material" at 3970,1513.84 h50
  text "Thickness" at 4689.8,1513.84 h50
  text "Constant" at 5234.67,1513.84 h50
  text "Board Layer Stack" at 5712.88,1513.84 h50
  text "Silkscreen Top" at 2991.94,1413.84 h50
  text "Solder Mask Top" at 2991.94,1313.84 h50
  text "Solder Resist" at 3970,1313.84 h50
  text "0.40mil" at 4689.8,1313.84 h50
  text "3.5" at 5234.67,1313.84 h50
  text "1" at 2647.01,1213.84 h50
  text "Top" at 2991.94,1213.84 h50
  text "Copper" at 3970,1213.84 h50
  text "1.38mil" at 4689.8,1213.84 h50
  text "Dielectric 4" at 2991.94,1113.84 h50
  text "7.87mil" at 4689.8,1113.84 h50
  text "4.2" at 5234.67,1113.84 h50
  text "2" at 2647.01,1013.84 h50
  text "Mid1-H" at 2991.94,1013.84 h50
  text "Copper" at 3970,1013.84 h50
  text "1.38mil" at 4689.8,1013.84 h50
  text "Dielectric1" at 2991.94,913.84 h50
  text "FR-4" at 3970,913.84 h50
  text "7.87mil" at 4689.8,913.84 h50
  text "4.3" at 5234.67,913.84 h50
  text "3" at 2647.01,813.84 h50
  text "Mid2-PWR" at 2991.94,813.84 h50
  text "Copper" at 3970,813.84 h50
  text "1.38mil" at 4689.8,813.84 h50
  text "Dielectric3" at 2991.94,713.84 h50
  text "FR-4" at 3970,713.84 h50
  text "19.69mil" at 4689.8,713.84 h50
  text "4.3" at 5234.67,713.84 h50
  text "4" at 2647.01,613.84 h50
  text "GND" at 2991.94,613.84 h50
  text "Copper" at 3970,613.84 h50
  text "1.38mil" at 4689.8,613.84 h50
  text "Dielectric 5" at 2991.94,513.84 h50
  text "7.87mil" at 4689.8,513.84 h50
  text "4.2" at 5234.67,513.84 h50
  text "5" at 2647.01,413.84 h50
  text "Mid3-V" at 2991.94,413.84 h50
  text "Copper" at 3970,413.84 h50
  text "1.38mil" at 4689.8,413.84 h50
  text "Dielectric2" at 2991.94,313.84 h50
  text "FR-4" at 3970,313.84 h50
  text "7.87mil" at 4689.8,313.84 h50
  text "4.2" at 5234.67,313.84 h50
  text "6" at 2647.01,213.84 h50
  text "Bottom" at 2991.94,213.84 h50
  text "Copper" at 3970,213.84 h50
  text "1.38mil" at 4689.8,213.84 h50
  text "Solder Mask Bottom" at 2991.94,113.84 h50
  text "Solder Resist" at 3970,113.84 h50
  text "0.40mil" at 4689.8,113.84 h50
  text "3.5" at 5234.67,113.84 h50
  text "Silkscreen Bottom" at 2991.94,13.84 h50
Drill Drawing:
  circle w10: c116.07,3232.53 r16.67
  circle w10: c116.07,3232.53 r27.78
  circle w10: c116.07,3107.53 r27.78
  lines w10: 37.95,2292.25 5453.15,2292.25 ; 37.95,3417.25 5453.15,3417.25 ; 502.34,2167.25 502.34,3542.25 ; 1005.54,2167.25 1005.54,3542.25 ; 1966.93,2167.25 1966.93,3542.25 ; 2393.83,2167.25 2393.83,3542.25 ; 3010.66,2167.25 3010.66,3542.25 ; 4007.37,2167.25 4007.37,3542.25 ; 4504.25,2167.25 4504.25,3542.25 ; 37.95,2167.25 5453.15,2167.25 5453.15,3542.25 37.95,3542.25 37.95,2167.25 ; 88.29,2343.64 102.18,2343.64 102.18,2329.75 129.96,2329.75 129.96,2343.64 143.85,2343.64 143.85,2371.42 129.96,2371.42 129.96,2385.31 102.18,2385.31 102.18,2371.42 88.29,2371.42 88.29,2343.64 ; 88.29,2454.75 116.07,2468.64 143.85,2454.75 129.96,2482.53 143.85,2510.31 116.07,2496.42 88.29,2510.31 102.18,2482.53 88.29,2454.75 ; 88.29,2635.31 143.85,2635.31 116.07,2579.75 88.29,2635.31 ; 88.29,2704.75 143.85,2704.75 143.85,2760.31 88.29,2760.31 88.29,2704.75 ; 88.29,2829.75 88.29,2843.64 102.18,2857.53 88.29,2871.42 88.29,2885.31 102.18,2885.31 116.07,2871.42 129.96,2885.31 143.85,2885.31 143.85,2871.42 129.96,2857.53 143.85,2843.64 143.85,2829.75 129.96,2829.75 116.07,2843.64 102.18,2829.75 88.29,2829.75 ; 88.29,2982.53 116.07,2954.75 143.85,2982.53 116.07,3010.31 88.29,2982.53 ; 88.29,3329.75 143.85,3329.75 143.85,3385.31 88.29,3385.31 88.29,3329.75 ; 99.4,3340.87 132.74,3340.87 132.74,3374.2 99.4,3374.2 99.4,3340.87
  text "Symbol" at 112.95,3454.75 h60
  text "Count" at 539.84,3454.75 h60
  text "Hole Size" at 1043.04,3454.75 h60
  text "Plated" at 2004.43,3454.75 h60
  text "Hole Type" at 2431.33,3454.75 h60
  text "Drill Layer Pair" at 3048.16,3454.75 h60
  text "Via/Pad" at 4044.87,3454.75 h60
  text "Pad Shape" at 4541.75,3454.75 h60
  text "2" at 539.84,3329.75 h50
  text "8.27mil (0.210mm)" at 1043.04,3329.75 h50
  text "PTH" at 2004.43,3329.75 h50
  text "Round" at 2431.33,3329.75 h50
  text "Top - Bottom" at 3048.16,3329.75 h50
  text "Via" at 4044.87,3329.75 h50
  text "Rounded" at 4541.75,3329.75 h50
  text "2" at 539.84,3204.75 h50
  text "10.00mil (0.254mm)" at 1043.04,3204.75 h50
  text "PTH" at 2004.43,3204.75 h50
  text "Round" at 2431.33,3204.75 h50
  text "Top - Bottom" at 3048.16,3204.75 h50
  text "Via" at 4044.87,3204.75 h50
  text "Rounded" at 4541.75,3204.75 h50
  text "3" at 539.84,3079.75 h50
  text "12.00mil (0.305mm)" at 1043.04,3079.75 h50
  text "PTH" at 2004.43,3079.75 h50
  text "Round" at 2431.33,3079.75 h50
  text "Top - Bottom" at 3048.16,3079.75 h50
  text "Via" at 4044.87,3079.75 h50
  text "Rounded" at 4541.75,3079.75 h50
  text "4" at 539.84,2954.75 h50
  text "19.69mil (0.500mm)" at 1043.04,2954.75 h50
  text "PTH" at 2004.43,2954.75 h50
  text "Slot" at 2431.33,2954.75 h50
  text "Top - Bottom" at 3048.16,2954.75 h50
  text "Pad" at 4044.87,2954.75 h50
  text "Rounded Rectangle" at 4541.75,2954.75 h50
  text "4" at 539.84,2829.75 h50
  text "33.47mil (0.850mm)" at 1043.04,2829.75 h50
  text "PTH" at 2004.43,2829.75 h50
  text "Round" at 2431.33,2829.75 h50
  text "Top - Bottom" at 3048.16,2829.75 h50
  text "Pad" at 4044.87,2829.75 h50
  text "Rounded" at 4541.75,2829.75 h50
  text "4" at 539.84,2704.75 h50
  text "38.98mil (0.990mm)" at 1043.04,2704.75 h50
  text "NPTH" at 2004.43,2704.75 h50
  text "Round" at 2431.33,2704.75 h50
  text "Top - Bottom" at 3048.16,2704.75 h50
  text "Pad" at 4044.87,2704.75 h50
  text "Rounded" at 4541.75,2704.75 h50
  text "4" at 539.84,2579.75 h50
  text "145.67mil (3.700mm)" at 1043.04,2579.75 h50
  text "PTH" at 2004.43,2579.75 h50
  text "Round" at 2431.33,2579.75 h50
  text "Top - Bottom" at 3048.16,2579.75 h50
  text "Pad" at 4044.87,2579.75 h50
  text "Rounded" at 4541.75,2579.75 h50
  text "58" at 539.84,2454.75 h50
  text "16.00mil (0.406mm)" at 1043.04,2454.75 h50
  text "PTH" at 2004.43,2454.75 h50
  text "Round" at 2431.33,2454.75 h50
  text "Top - Bottom" at 3048.16,2454.75 h50
  text "Via" at 4044.87,2454.75 h50
  text "Rounded" at 4541.75,2454.75 h50
  text "485" at 539.84,2329.75 h50
  text "8.00mil (0.203mm)" at 1043.04,2329.75 h50
  text "PTH" at 2004.43,2329.75 h50
  text "Round" at 2431.33,2329.75 h50
  text "Top - Bottom" at 3048.16,2329.75 h50
  text "Via" at 4044.87,2329.75 h50
  text "Rounded" at 4541.75,2329.75 h50
  text "566 Total" at 539.84,2204.75 h50
  text "Slot definitions :" at 112.95,2080.61 h50
  text "Routed Path Length" at 978.19,2080.61 h50
  text "= Calculated from tool start centre position to tool end centre position." at 1901.74,2080.61 h50
  text "Hole Length" at 978.19,1993.96 h50
  text "= Routed Path Length + Tool Size = Slot length as defined in the PCB layout" at 1560.19,1993.96 h50
Board Outline:
  the board outline again, w3.94

## Dimensions
72.83,122.05 to -196.85,0 on Dimensions
122.05,59.06 to 0,-51.18 on Dimensions
118.11,1771.65 to 118.11,0 on Dimensions
122.05,122.05 to 59.06,1649.61 on Dimensions
0,118.11 to 2401.57,118.11 on Dimensions
122.05,122.05 to 2043.31,59.06 on Dimensions

## Text inside footprints (layer, text, board x,y; h text height)
U9: Silkscreen Top "1" at 1363.74,1496.85 h40; Silkscreen Top "11" at 1363.74,996.85 h40; Silkscreen Top "12" at 1702.4,996.85 h40; Silkscreen Top "22" at 1701.34,1496.85 h40